# Altium PCB LattePanda_Mu.PcbDoc
Units mm, origin at the board's own origin, x right, y up, seen from the top; angles counter-clockwise.
Board outline 170 x 100 mm, 6 copper layers (Top Layer, Layer 3, Layer 1, Layer 2, Layer 4, Bottom Layer), stack 1.538 mm thick; 197 components, 174 nets, 1059 pads, 0 vias.
Unrouted connection lines stored in the file: 516.
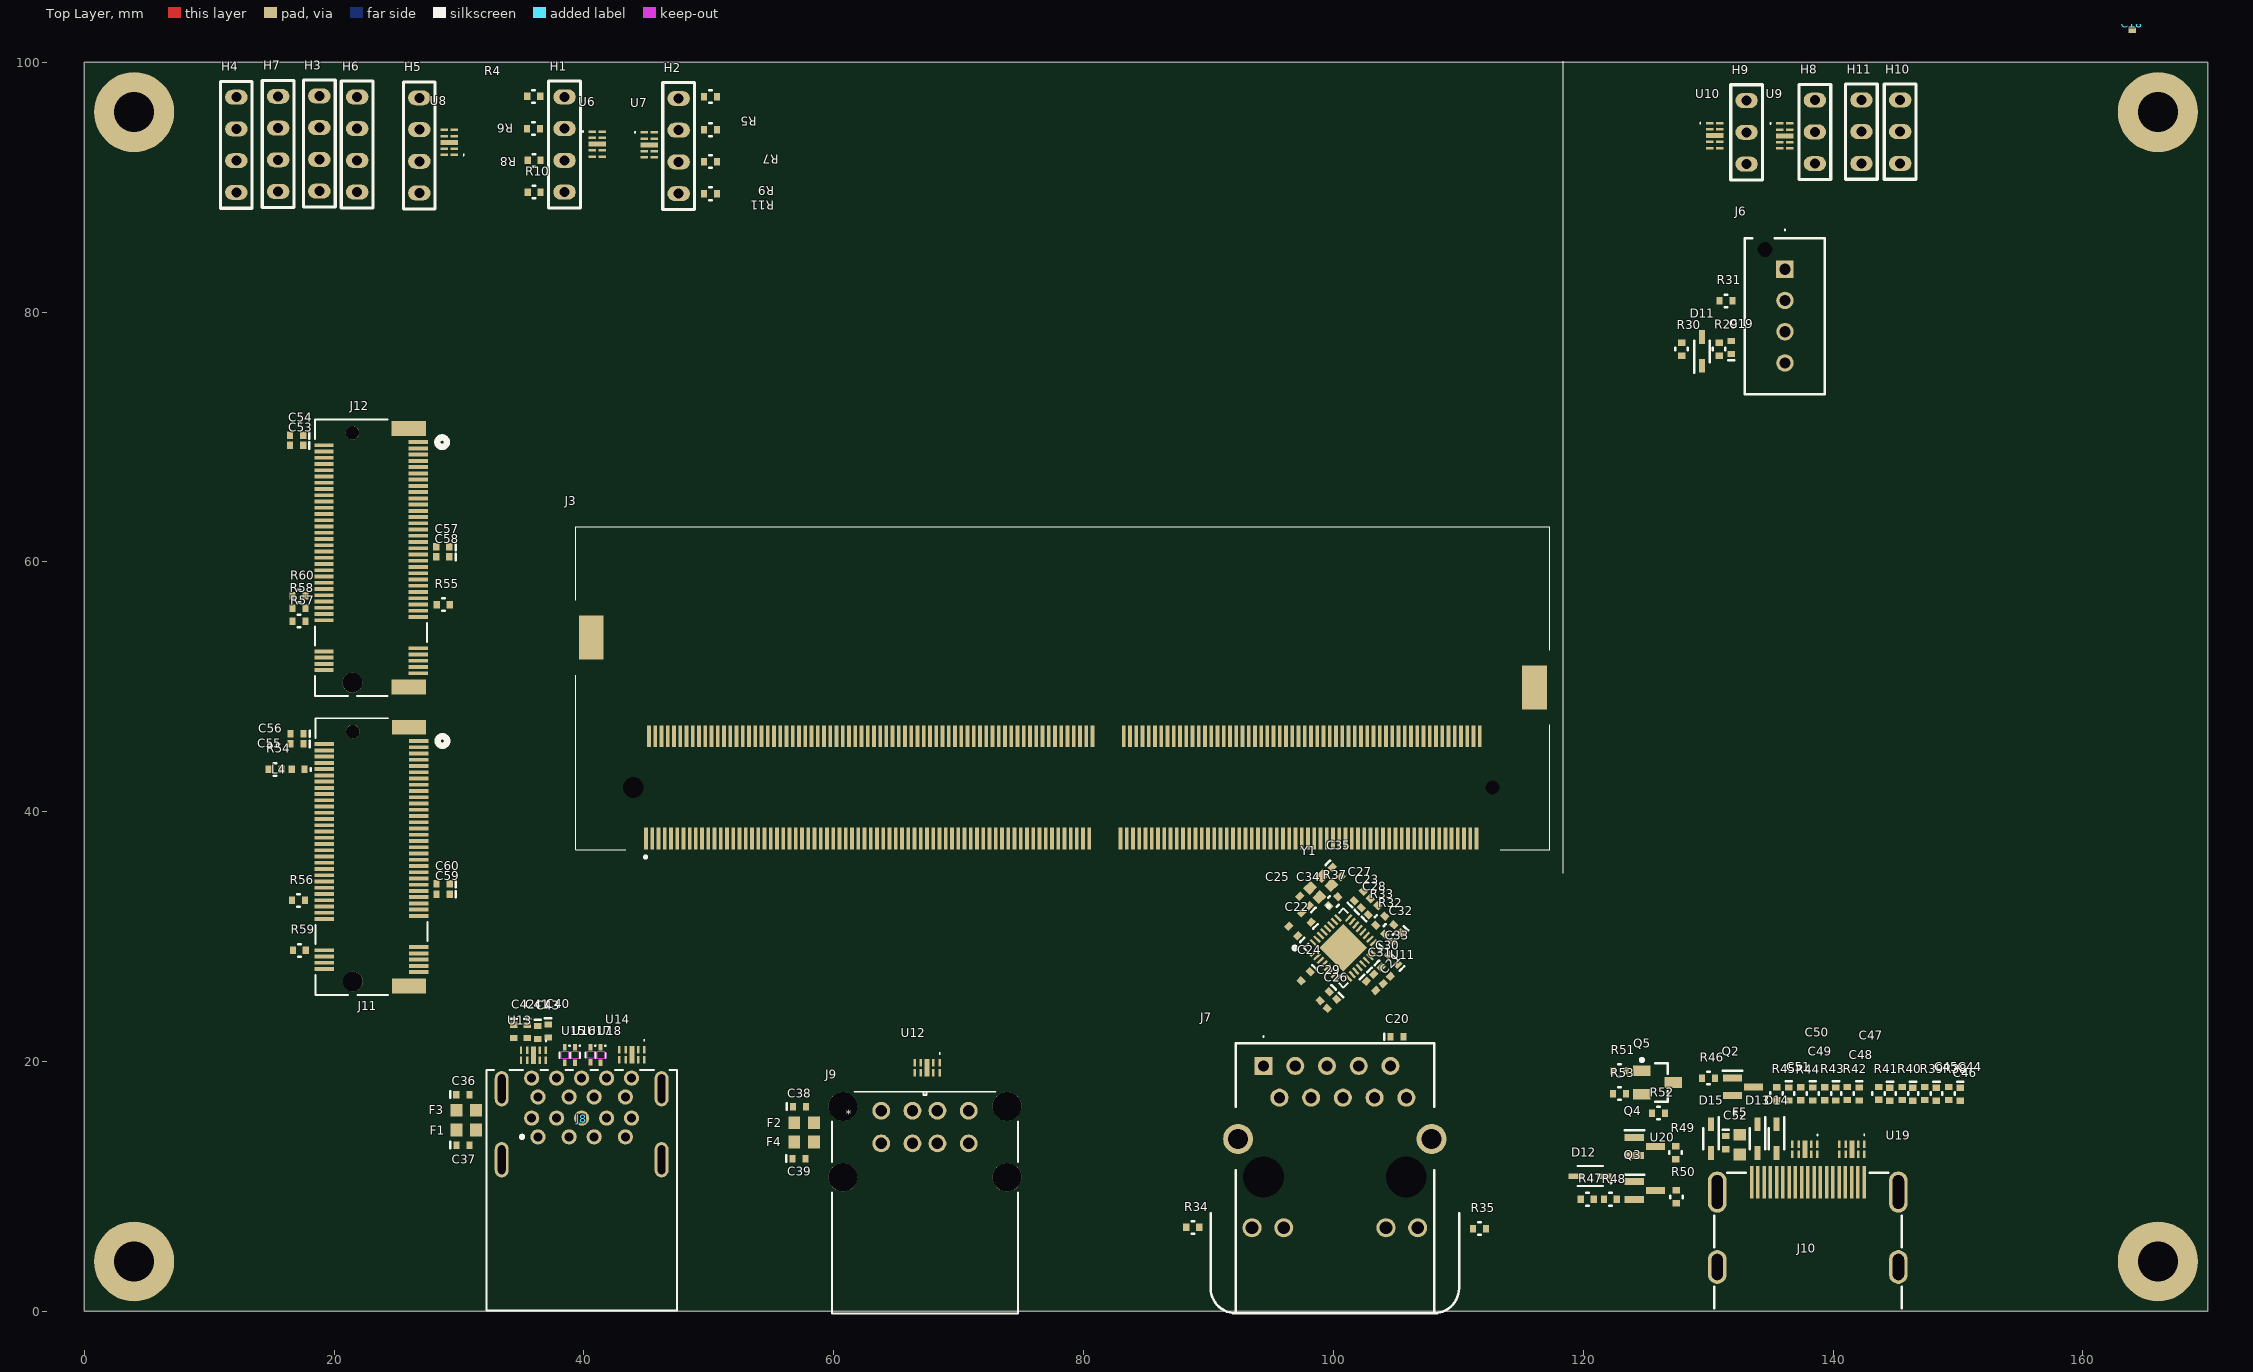
[diagram p0: Top Layer view]
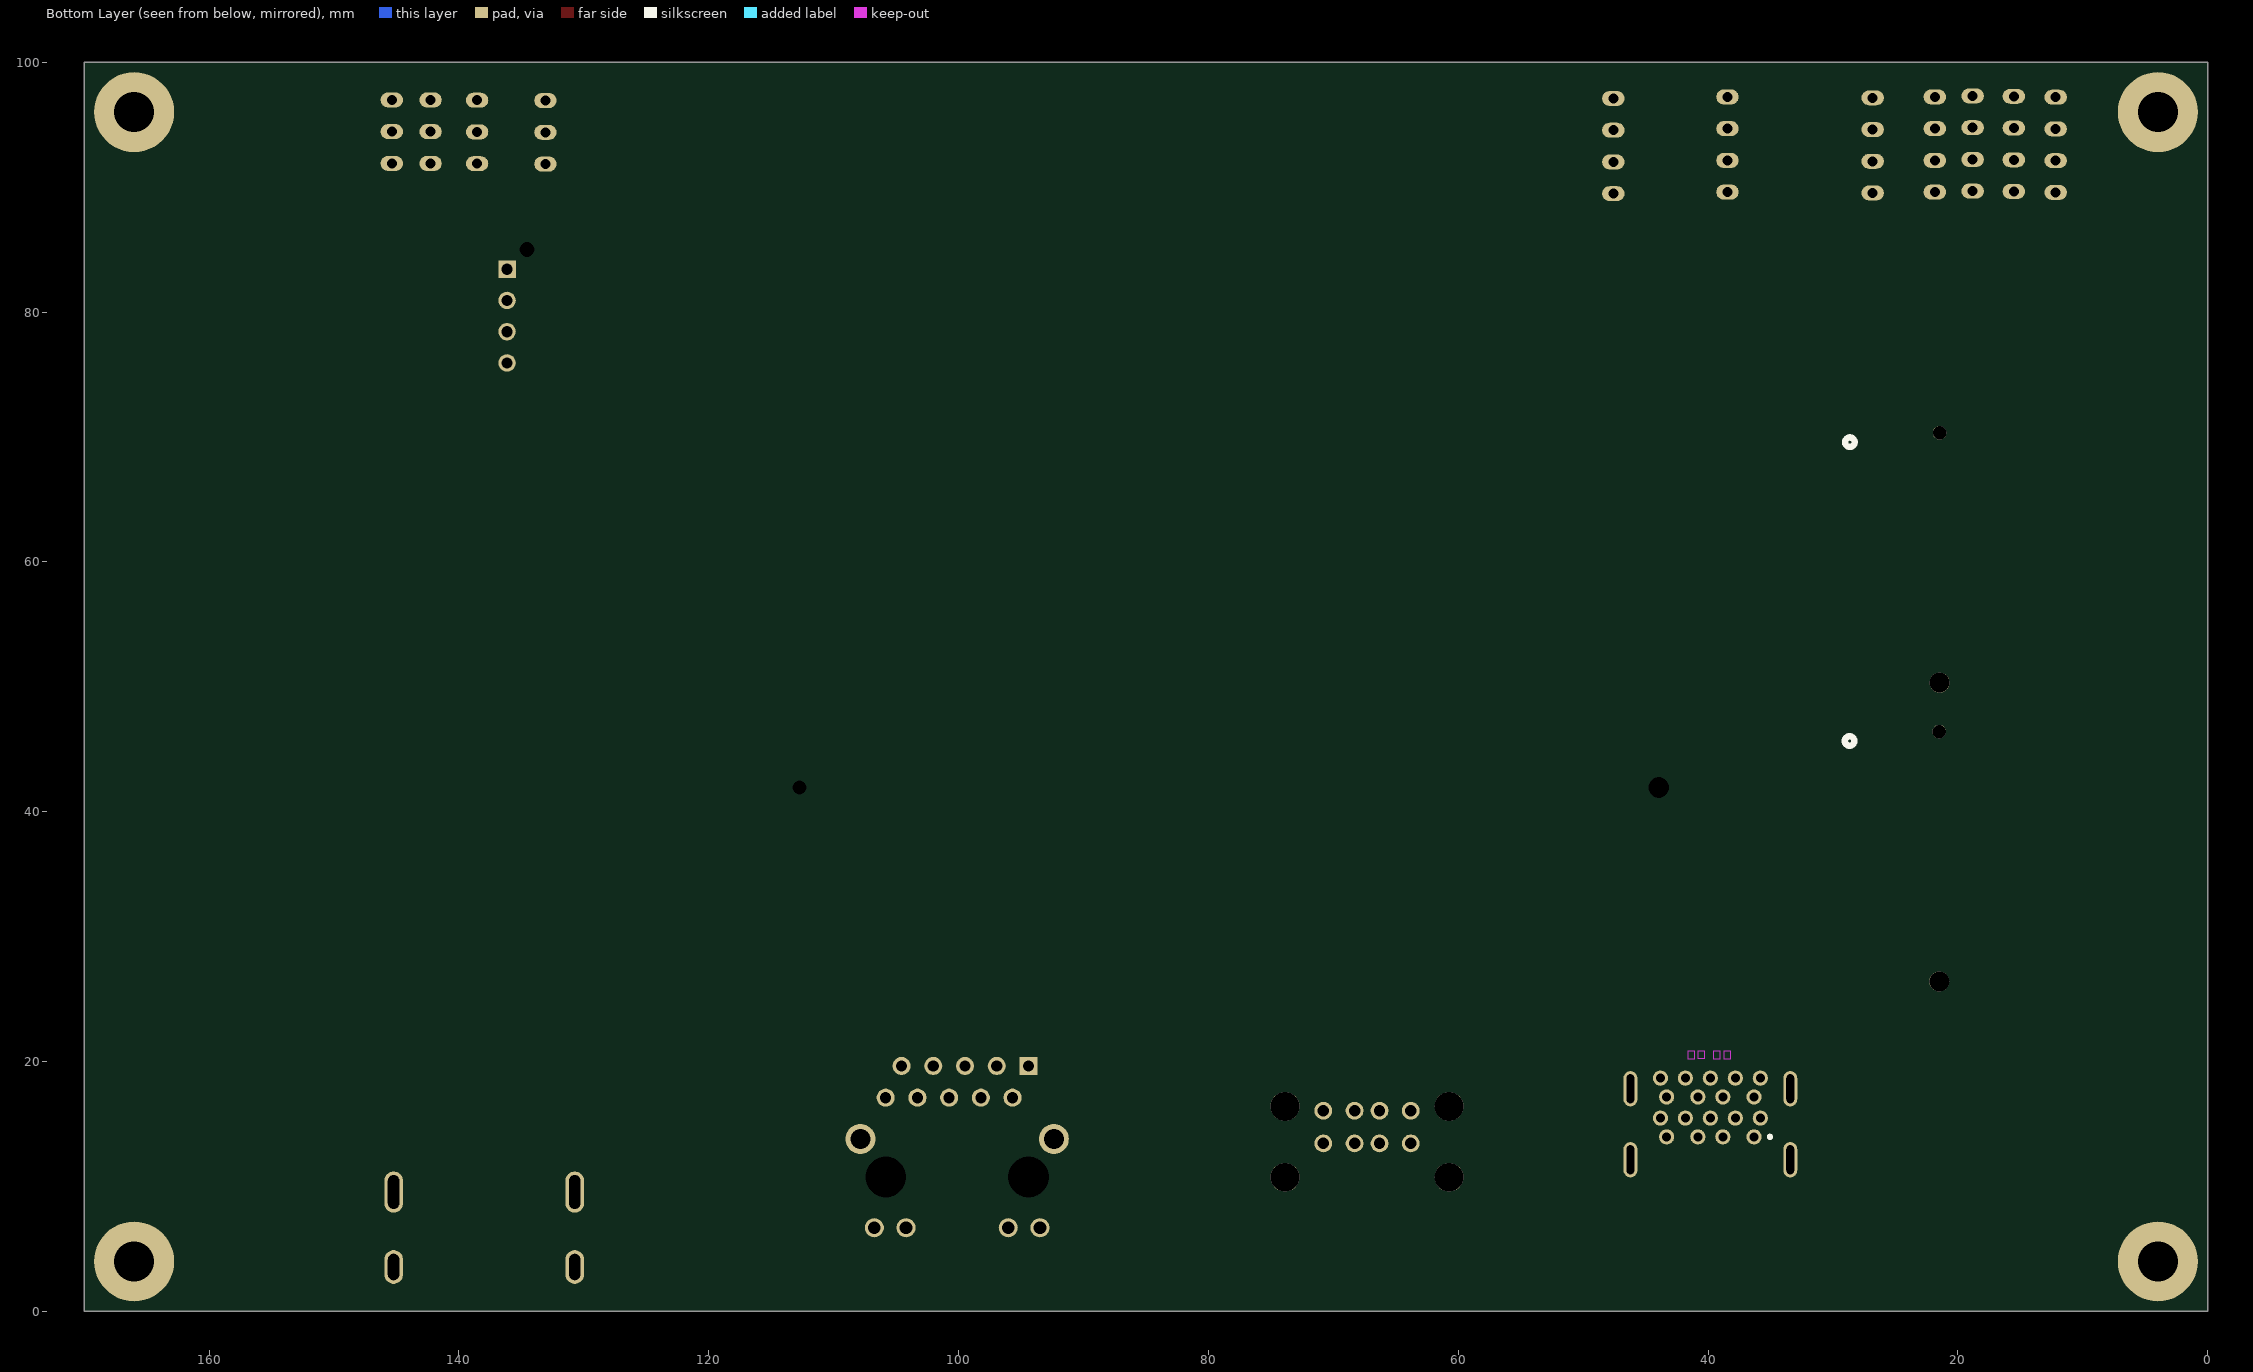
[diagram p1: Bottom Layer view, seen from below]

## Layer stack, top to bottom
Top Solder: solder mask 0.0102, Solder Resist, Dk 3.5
Top Layer: signal copper 0.035
Dielectric 4: prepreg 0.0994, PP-015, Dk 4.4
Layer 3: signal copper 0.0152
Dielectric 2: core 0.55, Core-026, Dk 4.4
Layer 1: signal copper 0.0152
Dielectric 1: prepreg 0.1088, PP-016, Dk 4.4
Layer 2: signal copper 0.0152
Dielectric 3: core 0.55, Core-026, Dk 4.4
Layer 4: signal copper 0.0152
Dielectric 5: prepreg 0.0994, PP-015, Dk 4.4
Bottom Layer: signal copper 0.035
Bottom Solder: solder mask 0.0102, Solder Resist, Dk 3.5

## Board outline
0,0 170,0 170,100 0,100

## Design rules (kind name [scope] priority, off if disabled: settings)
BoardOutlineClearance [All] p1: gap=0.5 ignorepadtopadclearanceinfootprint=FALSE
Clearance [All] p1: gap=0.254 ignorepadtopadclearanceinfootprint=FALSE except(0.127: Arc-Arc Arc-Track Arc-SMDPad Arc-Via Track-Track Track-SMDPad Track-Via SMDPad-Via; 0.152: SMDPad-SMDPad; 0.203: Arc-Fill Arc-Poly Arc-Region Track-Fill Track-Poly Track-Region Via-Fill Via-Poly Via-Region Fill-Fill Fill-Poly Fill-Region Poly-Poly Poly-Region Region-Region; 0.25: Via-Via; 0.3: SMDPad-Fill SMDPad-Poly SMDPad-Region THPad-Fill THPad-Poly THPad-Region; 0.35: SMDPad-THPad THPad-THPad THPad-Via THPad-Text THPad-Hole)
DiffPairsRouting [All] p1: maxlimit=0.254 minlimit=0.254 mostfreqgap=0.254 toplayer_minwidth=0.381 toplayer_maxwidth=0.381 toplayer_prefwidth=0.381 midlayer1_minwidth=0.381 midlayer1_maxwidth=0.381 midlayer1_prefwidth=0.381 midlayer2_minwidth=0.381 midlayer2_maxwidth=0.381 midlayer2_prefwidth=0.381 midlayer3_minwidth=0.381 midlayer3_maxwidth=0.381 midlayer3_prefwidth=0.381 midlayer4_minwidth=0.381 midlayer4_maxwidth=0.381 midlayer4_prefwidth=0.381 bottomlayer_minwidth=0.381 bottomlayer_maxwidth=0.381 bottomlayer_prefwidth=0.381 maxuncoupledlength=12.7
HoleSize [All] p1: absolutevalues=TRUE maxlimit=6.2 minlimit=0.25 maxpercent=80.000 minpercent=20.000
HoleToHoleClearance [All] p1: gap=0.2 allowstackedmicrovias=TRUE
MinimumSolderMaskSliver [All] p1: minsoldermaskwidth=0.13
PlaneConnect [All] p1: planeconnectstyle=Relief reliefexpansion=0.3 reliefentries=4 reliefconductorwidth=0.3 reliefairgap=0.2
PolygonConnect [All] p1: thpad.connectstyle=Relief thpad.reliefconductorwidth=0.5 thpad.reliefentries=4 thpad.polygonreliefangle="90 Angle" thpad.airgapwidth=0.2 smdpad.connectstyle=Relief smdpad.reliefconductorwidth=0.5 smdpad.reliefentries=4 smdpad.polygonreliefangle="90 Angle" smdpad.airgapwidth=0.2 via.connectstyle=Direct via.reliefconductorwidth=0.254 via.reliefentries=4 via.polygonreliefangle="90 Angle" via.airgapwidth=0.254
RoutingVias [All] p1: holewidth=0.3 width=0.6 viastyle="Through Hole" minholewidth=0.2 minwidth=0.2 maxholewidth=0.6 maxwidth=0.7
SilkToSolderMaskClearance [IsPad] p1: minsilkscreentomaskgap=0.15 clearancetoexposedcopper=TRUE
SolderMaskExpansion [All] p1: expansion=0.076 istentingtop=FALSE
Width [All] p1: maxlimit=0.254 minlimit=0.254 preferedwidth=0.254
24 further rules are at their usual default settings.

## Classes and differential pairs
differential pair class 100_OHM_DIFF: TMD_CK TMD_D0 TMD_D1 TMD_D2 TMDS_CK TMDS_D0 TMDS_D1 TMDS_D2
differential pair class 90_OHM_DIFF: STDA_SSRX1 STDA_SSRX2 STDA_SSTX1 STDA_SSTX2 USB2_D1 USB2_D2 USB3_D1 USB3_D2 USB3_SSTX USB4_SSTX
component class "U_[8] Sockets": C53 C54 C55 C56 C57 C58 C59 C60 J11 J12 L4 R54 R55 R56 R57 R58 R59 R60
component class "U_[7] Mini_HDMI": C44 C45 C46 C47 C48 C49 C50 C51 C52 D12 D13 D14 D15 F5 J10 Q2 Q3 Q4 Q5 R38 R39 R40 R41 R42 R43 R44 R45 R46 R47 R48 R49 R50 R51 R52 R53 U19 U20
component class "U_[6] USB": C36 C37 C38 C39 C40 C41 C42 C43 F1 F2 F3 F4 J8 J9 U12 U13 U14 U15 U16 U17 U18
component class "U_[5] Ethernet": C20 C21 C22 C23 C24 C25 C26 C27 C28 C29 C30 C31 C32 C33 C34 C35 J7 R32 R33 R34 R35 R36 R37 U11 Y1
component class "U_[4] GPIOs": H1 H2 H3 H4 H5 H6 H7 H8 H9 H10 H11 U6 U7 U8 U9 U10
component class "U_[3] Fan": C19 D11 J6 R29 R30 R31
component class "U_[2] Power_Supply": B1 B2 C1 C2 C3 C4 C5 C6 C7 C8 C9 C10 C11 C12 C13 C14 C15 C16 C17 C18 C61 D1 D2 D3 D4 D5 D6 D7 D8 D9 D10 J4 J5 JP1 L1 L2 L3 Q1 R14 R15 R16 R17 R18 R19 R20 R21 R22 R23 R24 R25 R26 R27 R28 U1 U2 U3 U4 U5
component class "U_[1] Conn_SODIMM": J1 J2 J3 R1 R2 R3 R4 R5 R6 R7 R8 R9 R10 R11 R12 R13
differential pair USB_D: +USB_D_P -USB_D_N
differential pair USB4_SSTX: +USB4_SSTX_P -USB4_SSTX_N
differential pair USB3_SSTX: +USB3_SSTX_P -USB3_SSTX_N
differential pair USB3_D2: +USB3_D2_P -USB3_D2_N
differential pair USB3_D1: +USB3_D1_P -USB3_D1_N
differential pair USB2_D2: +USB2_D2_P -USB2_D2_N
differential pair USB2_D1: +USB2_D1_P -USB2_D1_N
differential pair TMDS_D2: +TMDS_D2_P -TMDS_D2_N
differential pair TMDS_D1: +TMDS_D1_P -TMDS_D1_N
differential pair TMDS_D0: +TMDS_D0_P -TMDS_D0_N
differential pair TMDS_CK: +TMDS_CK_P -TMDS_CK_N
differential pair TMD_D2: +TMD_D2_P -TMD_D2_N
differential pair TMD_D1: +TMD_D1_P -TMD_D1_N
differential pair TMD_D0: +TMD_D0_P -TMD_D0_N
differential pair TMD_CK: +TMD_CK_P -TMD_CK_N
differential pair STDA_SSTX2: +STDA_SSTX2_P -STDA_SSTX2_N
differential pair STDA_SSTX1: +STDA_SSTX1_P -STDA_SSTX1_N
differential pair STDA_SSRX2: +STDA_SSRX2_P -STDA_SSRX2_N
differential pair STDA_SSRX1: +STDA_SSRX1_P -STDA_SSRX1_N

## Components (designator, comment, footprint, x,y, rotation, side; value= is the part's Value field where it differs from the comment)
B1 "SMD Boton" "Push Boton Nano 2 Pin" 152.654,112.395 r90 top
B2 "SMD Boton" "Push Boton Nano 2 Pin" 178.816,107.823 r90 top
C1 "10uF" "CAPACITOR 0805" 291.49,139.726 r0 top
C2 "220nF" "Capacitor 0402" 294.792,140.361 r0 top
C3 "220nF" "Capacitor 0402" 285.648,140.361 r0 top
C4 "22uF" "Capacitor 0603" 268.122,140.107 r0 top
C5 "22uF" "Capacitor 0603" 272.694,140.107 r0 top
C6 "22uF" "Capacitor 0603" 277.139,140.107 r0 top
C7 "22uF" "Capacitor 0603" 281.711,140.107 r0 top
C8 "1uF" "Capacitor 0402" 236.118,140.361 r0 top
C9 "10uF" "CAPACITOR 0805" 285.496,103.251 r0 top
C10 "220nF" "Capacitor 0402" 288.925,102.616 r90 top
C11 "220nF" "Capacitor 0402" 279.019,102.616 r90 top
C12 "22uF" "Capacitor 0603" 256.921,101.854 r90 top
C13 "22uF" "Capacitor 0603" 262.509,101.854 r90 top
C14 "22uF" "Capacitor 0603" 268.097,101.854 r90 top
C15 "22uF" "Capacitor 0603" 273.685,101.854 r90 top
C16 "1uF" "Capacitor 0402" 196.469,102.616 r90 top
C17 "1uF" "Capacitor 0402" 145.923,115.824 r90 top
C18 "1uF" "Capacitor 0402" 163.957,102.616 r90 top
C19 "100nF" "Capacitor 0402" 131.85,77.675 r270 top
C20 "100nF" "Capacitor 0402" 105.602,21.974 r180 top
C21 "100nF" "Capacitor 0402" 103.377,25.698 r135 top
C22 "100nF" "Capacitor 0402" 96.432,30.814 r315 top
C23 "100nF" "Capacitor 0402" 102.949,33.03 r225 top
C24 "100nF" "Capacitor 0402" 97.423,26.46 r45 top
C25 "100nF" "Capacitor 0402" 97.483,31.892 r315 top
C26 "100nF" "Capacitor 0402" 99.521,24.261 r45 top
C27 "100nF" "Capacitor 0402" 102.396,33.607 r225 top
C28 "100nF" "Capacitor 0402" 103.536,32.477 r225 top
C29 "100nF" "Capacitor 0402" 98.94,24.865 r45 top
C30 "100nF" "Capacitor 0402" 104.561,26.821 r135 top
C31 "100nF" "Capacitor 0402" 103.97,26.255 r135 top
C32 "100nF" "Capacitor 0402" 104.717,29.593 r45 top
C33 "100nF" "Capacitor 0402" 104.42,28.534 r315 top
C34 "12pF" "Capacitor 0402" 97.33,33.22 r315 top
C35 "12pF" "Capacitor 0402" 100.633,34.823 r135 top
C36 "22uF" "Capacitor 0402" 30.823,17.353 r180 top
C37 "22uF" "Capacitor 0402" 30.839,13.306 r180 top
C38 "22uF" "Capacitor 0402" 57.775,16.4 r180 top
C39 "22uF" "Capacitor 0402" 57.725,12.225 r180 top
C40 "100nF" "Capacitor 0402" 37.132,21.933 r90 top
C41 "100nF" "Capacitor 0402" 35.466,21.893 r90 top
C42 "100nF" "Capacitor 0402" 34.373,21.909 r90 top
C43 "100nF" "Capacitor 0402" 36.306,21.813 r90 top
C44 "100nF" "Capacitor 0402" 150.175,16.875 r90 top
C45 "100nF" "Capacitor 0402" 148.275,16.875 r90 top
C46 "100nF" "Capacitor 0402" 146.4,16.875 r90 top
C47 "100nF" "Capacitor 0402" 144.55,16.875 r90 top
C48 "100nF" "Capacitor 0402" 142.1,16.9 r90 top
C49 "100nF" "Capacitor 0402" 140.225,16.9 r90 top
C50 "100nF" "Capacitor 0402" 138.375,16.9 r90 top
C51 "100nF" "Capacitor 0402" 136.45,16.9 r90 top
C52 "100nF" "Capacitor 0402" 131.4,13 r90 top
C53 "100nF" "Capacitor 0402" 16.5,69.325 r0 top
C54 "10uF" "Capacitor 0402" 16.5,70.125 r0 top
C55 "100nF" "Capacitor 0402" 16.525,45.425 r0 top
C56 "10uF" "Capacitor 0402" 16.525,46.25 r0 top
C57 "220nF" "Capacitor 0402" 28.2,61.2 r0 top
C58 "220nF" "Capacitor 0402" 28.2,60.4 r0 top
C59 "220nF" "Capacitor 0402" 28.225,33.4 r0 top
C60 "220nF" "Capacitor 0402" 28.225,34.225 r0 top
C61 "1uF" "Capacitor 0402" 209.423,11.684 r90 top
D1 "MBRS340T3G" DIOM7959X261N 250.952,16.764 r90 top
D2 "MBRS340T3G" DIOM7959X261N 243.205,16.764 r90 top
D3 "MBRS340T3G" DIOM7959X261N 235.458,16.764 r90 top
D4 "MBRS340T3G" DIOM7959X261N 227.711,16.764 r90 top
D5 "MBRS340T3G" DIOM7959X261N 220.091,16.764 r90 top
D6 "MBRS340T3G" DIOM7959X261N 212.344,16.764 r90 top
D7 "PESD5V0S1BAF" SOD2512X110N 209.55,102.997 r0 top
D8 "PESD5V0S1BAF" SOD2512X110N 214.757,102.997 r0 top
D9 "PESD5V0S1BAF" SOD2512X110N 175.514,102.997 r0 top
D10 "PESD5V0S1BAF" SOD2512X110N 180.848,102.997 r0 top
D11 "B5819WSHE3-TP" SOD2512X115N 129.5,76.85 r90 top
D12 "1N5819WS" SOD-323_MCC 120.55,10.825 r180 top
D13 "PESD5V0S1BAF" SOD2512X110N 133.95,13.825 r270 top
D14 "PESD5V0S1BAF" SOD2512X110N 135.475,13.825 r270 top
D15 "PESD5V0S1BAF" SOD2512X110N 130.225,13.825 r270 top
F1 "0603L100SLYR" FUSC1608X100N 30.584,14.524 r180 top
F2 "0603L100SLYR" FUSC1608X100N 57.625,15.1 r180 top
F3 "0603L100SLYR" FUSC1608X100N 30.584,16.091 r180 top
F4 "0603L100SLYR" FUSC1608X100N 57.625,13.55 r180 top
F5 "0603L100SLYR" FUSC1608X100N 132.525,13.35 r90 top
H1 "Header 4x1" "HM 4X1" 38.45,89.6 r90 top
H2 "Header 4x1" "HM 4X1" 47.588,89.474 r90 top
H3 "Header 4x1" "HM 4X1" 18.825,89.675 r90 top
H4 "Header 4x1" "HM 4X1" 12.175,89.575 r90 top
H5 "Header 4x1" "HM 4X1" 26.825,97.15 r270 top
H6 "Header 4x1" "HM 4X1" 21.85,89.6 r90 top
H7 "Header 4x1" "HM 4X1" 15.525,89.65 r90 top
H8 "Header 3x1" "HM 3X1" 138.55,91.875 r90 top
H9 "Header 3x1" "HM 3X1" 133.075,91.85 r90 top
H10 "Header 3x1" "HM 3X1" 145.375,91.9 r90 top
H11 "Header 3x1" "HM 3X1" 142.275,91.9 r90 top
J1 "S8411-45R" HARWIN_S8411-45R 215.9,35.433 r0 top
J2 "Header 3x1" "HM 3X1" 240.919,75.438 r90 top
J3 "2309413-1" 23094131 78.341,49.867 r180 top
J4 "PJACK" "JACK DC" 251.485,126.137 r90 top
J5 "UJ20-C-H-G-SMT-1-P16-TR" SAMESKY_UJ20-C-H-G-SMT-1-P16-TR 172.745,127.661 r90 top
J6 "B04B-XASK-1-A_LF__SN_" B04BXASK1ALFSN 136.15,83.425 r90 top
J7 "HFJ11-1G01E-L12RL" HFJ111G01EL12RL 94.409,19.645 r0 top
J8 "USB1100-30-A" CONN_USB1100_GCT 36.322,13.97 r0 top
J9 "5787745-2" CONN_5787745-2_TEC 63.805,16.064 r0 top
J10 "685119134923" 685119134923 137.98,5.027 r0 top
J11 "1-2199230-6" CONN67_2199230_TEC 19.222,27.16 r270 top
J12 "2199230-4" CONN67_2199230_TEC 19.197,51.084 r270 top
JP1 "*" SolderJumper-3_P1.3mm_Bridged12 232.689,139.853 r0 top
L1 "B82472P6222M000" IND_EPCOS_B82472P6_EPC 308.635,136.551 r0 top
L2 "Led 0402" "LED 0402" 210.083,140.107 r0 top
L3 "B82472P6222M000" IND_EPCOS_B82472P6_EPC 178.587,136.551 r0 top
L4 "Led 0402" "LED 0402" 17.125,43.4 r0 top
Q1 "2N7002" SOT23127P600-8N 199.923,138.583 r0 top
Q2 "2SK3018" SOT96P240X120-3N 132.8,17.975 r0 top
Q3 "2SK3018" SOT96P240X120-3N 124.95,9.675 r0 top
Q4 "2SK3018" SOT96P240X120-3N 124.95,13.2 r0 top
Q5 "2N7002" SOT23127P600-8N 125.95,18.325 r0 top
R1 "10K" "Resistencia 0402" 244.729,81.28 r0 top
R2 "10K" "Resistencia 0402" 202.438,81.28 r0 top
R3 "10K" "Resistencia 0402" 206.756,81.28 r0 top
R4 "4k7" "Resistencia 0402" 35.987,97.254 r180 top
R5 "4k7" "Resistencia 0402" 50.131,97.243 r0 top
R6 "4k7" "Resistencia 0402" 35.969,94.682 r180 top
R7 "4k7" "Resistencia 0402" 50.131,94.593 r0 top
R8 "4k7" "Resistencia 0402" 36.019,92.132 r180 top
R9 "4k7" "Resistencia 0402" 50.131,92.043 r0 top
R10 "4k7" "Resistencia 0402" 36.018,89.592 r180 top
R11 "4k7" "Resistencia 0402" 50.131,89.468 r0 top
R12 "100k" "Resistencia 0402" 204.597,71.247 r90 top
R13 "100k" "Resistencia 0402" 199.009,71.247 r90 top
R14 "10K" "Resistencia 0402" 299.364,139.726 r90 top
R15 "100k" "Resistencia 0402" 262.153,139.726 r90 top
R16 "24.9k" "Resistencia 0402" 240.69,139.726 r90 top
R17 "100k" "Resistencia 0402" 225.323,139.726 r90 top
R18 "100k" "Resistencia 0402" 219.735,139.726 r90 top
R19 "330" "Resistencia 0402" 214.147,139.726 r90 top
R20 "1k" "Resistencia 0402" 203.987,139.726 r90 top
R21 "10k" "Resistencia 0402" 184.683,139.726 r90 top
R22 "100k" "Resistencia 0402" 251.079,103.251 r90 top
R23 "43.3k" "Resistencia 0402" 245.237,103.251 r90 top
R24 "10k" "Resistencia 0402" 218.694,103.251 r90 top
R25 "56k" "Resistencia 0402" 224.536,103.251 r90 top
R26 "1k" "Resistencia 0402" 202.311,103.251 r90 top
R27 "100" "Resistencia 0402" 185.039,103.251 r90 top
R28 "100" "Resistencia 0402" 190.881,103.251 r90 top
R29 "10K" "Resistencia 0402" 130.875,77.025 r270 top
R30 "21.5k" "Resistencia 0402" 127.875,77.025 r90 top
R31 "100" "Resistencia 0402" 131.425,80.9 r0 top
R32 "10K" "Resistencia 0402" 104.465,30.565 r45 top
R33 "10K" "Resistencia 0402" 103.754,31.284 r45 top
R34 "220" "Resistencia 0402" 88.75,6.725 r0 top
R35 "220" "Resistencia 0402" 111.7,6.625 r180 top
R36 "2.49k" "Resistencia 0402" 198.755,164.592 r90 top
R37 "1M" "Resistencia 0402" 100,32.825 r45 top
R38 "470" "Resistencia 0402" 149.25,17.45 r270 top
R39 "470" "Resistencia 0402" 147.325,17.45 r270 top
R40 "470" "Resistencia 0402" 145.525,17.45 r270 top
R41 "470" "Resistencia 0402" 143.645,17.452 r270 top
R42 "470" "Resistencia 0402" 141.15,17.45 r270 top
R43 "470" "Resistencia 0402" 139.35,17.425 r270 top
R44 "470" "Resistencia 0402" 137.4,17.425 r270 top
R45 "470" "Resistencia 0402" 135.475,17.425 r270 top
R46 "2k2" "Resistencia 0402" 130.025,18.675 r0 top
R47 "2k2" "Resistencia 0402" 120.325,8.975 r180 top
R48 "2k2" "Resistencia 0402" 122.175,8.975 r0 top
R49 "2k2" "Resistencia 0402" 127.4,12.7 r90 top
R50 "2k2" "Resistencia 0402" 127.45,9.175 r90 top
R51 "1M" "Resistencia 0402" 122.9,19.275 r180 top
R52 "1k" "Resistencia 0402" 126.025,15.875 r0 top
R53 "21k5" "Resistencia 0402" 122.9,17.425 r180 top
R54 "330" "Resistencia 0402" 15.285,43.396 r180 top
R55 "0" "Resistencia 0402" 28.75,56.575 r180 top
R56 "0" "Resistencia 0402" 17.15,32.9 r0 top
R57 "10k" "Resistencia 0402" 17.2,55.25 r180 top
R58 "10k" "Resistencia 0402" 17.2,56.275 r180 top
R59 "0" "Resistencia 0402" 17.225,28.9 r0 top
R60 "0" "Resistencia 0402" 17.2,57.275 r0 top
U1 "LMR33630BDDA" DDA0008J 317.779,137.821 r0 top
U2 "MM5Z3V3T1G" SOD-523_0P9X1P3_ONS 258.597,139.98 r0 top
U3 "LMR33630BDDA" DDA0008J 192.938,137.821 r0 top
U4 "USBLC6-2SC6" SOT95P280X145-6N 241.173,102.489 r0 top
U5 "*" ESSOP-10_CH224K 233.426,100.965 r0 top
U6 "ULC0524P" ESDLC0524DFN10TP 41.075,93.45 r270 top
U7 "ULC0524P" ESDLC0524DFN10TP 45.249,93.387 r270 top
U8 "ULC0524P" ESDLC0524DFN10TP 29.225,93.575 r90 top
U9 "ULC0524P" ESDLC0524DFN10TP 136.15,94.1 r270 top
U10 "ULC0524P" ESDLC0524DFN10TP 130.525,94.125 r270 top
U11 "RTL8111H-CG" RTL8111H-CG 100.802,29.092 r315 top
U12 "D3V3XA4B10LP" ESDLC0524DFN10TP 67.488,19.493 r180 top
U13 "D3V3XA4B10LP" ESDLC0524DFN10TP 35.967,20.497 r180 top
U14 "D3V3XA4B10LP" ESDLC0524DFN10TP 43.837,20.549 r180 top
U15 "ESD9B5.0ST5G" SOD-923_ONS 38.469,20.525 r270 top
U16 "ESD9B5.0ST5G" SOD-923_ONS 39.299,20.525 r270 top
U17 "ESD9B5.0ST5G" SOD-923_ONS 40.537,20.536 r270 top
U18 "ESD9B5.0ST5G" SOD-923_ONS 41.342,20.522 r270 top
U19 "D3V3XA4B10LP" ESDLC0524DFN10TP 141.5,12.975 r180 top
U20 "D3V3XA4B10LP" ESDLC0524DFN10TP 137.75,12.975 r180 top
Y1 "ECS-250-9-37B2-CKM-TR" XTAL_ECS-250-9-37B2-CKM-TR 98.99,34.014 r45 top

## Footprints (in the part's own frame and the unit in brackets; to place one, negate y for a bottom-side part, rotate by r counter-clockwise, add the part's x,y. Pads: shape width x height; smd on the part's side, far side on the other; paste and mask are expansions set on the pad)
23094131 [mm]
  rect 0.3x1.75 smd: 1(33.375,12.025) 2(33.125,3.825) 3(32.875,12.025) 4(32.625,3.825) 5(32.375,12.025) 6(32.125,3.825) 7(31.875,12.025) 8(31.625,3.825) 9(31.375,12.025) 10(31.125,3.825) 11(30.875,12.025) 12(30.625,3.825) 13(30.375,12.025) 14(30.125,3.825) 15(29.875,12.025) 16(29.625,3.825) 17(29.375,12.025) 18(29.125,3.825) 19(28.875,12.025) 20(28.625,3.825) 21(28.375,12.025) 22(28.125,3.825) 23(27.875,12.025) 24(27.625,3.825) 25(27.375,12.025) 26(27.125,3.825) 27(26.875,12.025) 28(26.625,3.825) 29(26.375,12.025) 30(26.125,3.825) 31(25.875,12.025) 32(25.625,3.825) 33(25.375,12.025) 34(25.125,3.825) 35(24.875,12.025) 36(24.625,3.825) 37(24.375,12.025) 38(24.125,3.825) 39(23.875,12.025) 40(23.625,3.825) 41(23.375,12.025) 42(23.125,3.825) 43(22.875,12.025) 44(22.625,3.825) 45(22.375,12.025) 46(22.125,3.825) 47(21.875,12.025) 48(21.625,3.825) 49(21.375,12.025) 50(21.125,3.825) 51(20.875,12.025) 52(20.625,3.825) 53(20.375,12.025) 54(20.125,3.825) 55(19.875,12.025) 56(19.625,3.825) 57(19.375,12.025) 58(19.125,3.825) 59(18.875,12.025) 60(18.625,3.825) 61(18.375,12.025) 62(18.125,3.825) 63(17.875,12.025) 64(17.625,3.825) 65(17.375,12.025) 66(17.125,3.825) 67(16.875,12.025) 68(16.625,3.825) 69(16.375,12.025) 70(16.125,3.825) 71(15.875,12.025) 72(15.625,3.825) 73(15.375,12.025) 74(15.125,3.825) 75(14.875,12.025) 76(14.625,3.825) 77(14.375,12.025) 78(14.125,3.825) 79(13.875,12.025) 80(13.625,3.825) 81(13.375,12.025) 82(13.125,3.825) 83(12.875,12.025) 84(12.625,3.825) 85(12.375,12.025) 86(12.125,3.825) 87(11.875,12.025) 88(11.625,3.825) 89(11.375,12.025) 90(11.125,3.825) 91(10.875,12.025) 92(10.625,3.825) 93(10.375,12.025) 94(10.125,3.825) 95(9.875,12.025) 96(9.625,3.825) 97(9.375,12.025) 98(9.125,3.825) 99(8.875,12.025) 100(8.625,3.825) 101(8.375,12.025) 102(8.125,3.825) 103(7.875,12.025) 104(7.625,3.825) 105(7.375,12.025) 106(7.125,3.825) 107(6.875,12.025) 108(6.625,3.825) 109(6.375,12.025) 110(6.125,3.825) 111(5.875,12.025) 112(5.625,3.825) 113(5.375,12.025) 114(5.125,3.825) 115(4.875,12.025) 116(4.625,3.825) 117(4.375,12.025) 118(4.125,3.825) 119(3.875,12.025) 120(3.625,3.825) 121(3.375,12.025) 122(3.125,3.825) 123(2.875,12.025) 124(2.625,3.825) 125(2.375,12.025) 126(2.125,3.825) 127(1.875,12.025) 128(1.625,3.825) 129(1.375,12.025) 130(1.125,3.825) 131(0.875,12.025) 132(0.625,3.825) 133(0.375,12.025) 134(0.125,3.825) 135(-0.125,12.025) 136(-0.375,3.825) 137(-0.625,12.025) 138(-0.875,3.825) 139(-1.125,12.025) 140(-1.375,3.825) 141(-1.625,12.025) 142(-1.875,3.825) 143(-2.125,12.025) 144(-2.375,3.825) 145(-4.625,12.025) 146(-4.875,3.825) 147(-5.125,12.025) 148(-5.375,3.825) 149(-5.625,12.025) 150(-5.875,3.825) 151(-6.125,12.025) 152(-6.375,3.825) 153(-6.625,12.025) 154(-6.875,3.825) 155(-7.125,12.025) 156(-7.375,3.825) 157(-7.625,12.025) 158(-7.875,3.825) 159(-8.125,12.025) 160(-8.375,3.825) 161(-8.625,12.025) 162(-8.875,3.825) 163(-9.125,12.025) 164(-9.375,3.825) 165(-9.625,12.025) 166(-9.875,3.825) 167(-10.125,12.025) 168(-10.375,3.825) 169(-10.625,12.025) 170(-10.875,3.825) 171(-11.125,12.025) 172(-11.375,3.825) 173(-11.625,12.025) 174(-11.875,3.825) 175(-12.125,12.025) 176(-12.375,3.825) 177(-12.625,12.025) 178(-12.875,3.825) 179(-13.125,12.025) 180(-13.375,3.825) 181(-13.625,12.025) 182(-13.875,3.825) 183(-14.125,12.025) 184(-14.375,3.825) 185(-14.625,12.025) 186(-14.875,3.825) 187(-15.125,12.025) 188(-15.375,3.825) 189(-15.625,12.025) 190(-15.875,3.825) 191(-16.125,12.025) 192(-16.375,3.825) 193(-16.625,12.025) 194(-16.875,3.825) 195(-17.125,12.025) 196(-17.375,3.825) 197(-17.625,12.025) 198(-17.875,3.825) 199(-18.125,12.025) 200(-18.375,3.825) 201(-18.625,12.025) 202(-18.875,3.825) 203(-19.125,12.025) 204(-19.375,3.825) 205(-19.625,12.025) 206(-19.875,3.825) 207(-20.125,12.025) 208(-20.375,3.825) 209(-20.625,12.025) 210(-20.875,3.825) 211(-21.125,12.025) 212(-21.375,3.825) 213(-21.625,12.025) 214(-21.875,3.825) 215(-22.125,12.025) 216(-22.375,3.825) 217(-22.625,12.025) 218(-22.875,3.825) 219(-23.125,12.025) 220(-23.375,3.825) 221(-23.625,12.025) 222(-23.875,3.825) 223(-24.125,12.025) 224(-24.375,3.825) 225(-24.625,12.025) 226(-24.875,3.825) 227(-25.125,12.025) 228(-25.375,3.825) 229(-25.625,12.025) 230(-25.875,3.825) 231(-26.125,12.025) 232(-26.375,3.825) 233(-26.625,12.025) 234(-26.875,3.825) 235(-27.125,12.025) 236(-27.375,3.825) 237(-27.625,12.025) 238(-27.875,3.825) 239(-28.125,12.025) 240(-28.375,3.825) 241(-28.625,12.025) 242(-28.875,3.825) 243(-29.125,12.025) 244(-29.375,3.825) 245(-29.625,12.025) 246(-29.875,3.825) 247(-30.125,12.025) 248(-30.375,3.825) 249(-30.625,12.025) 250(-30.875,3.825) 251(-31.125,12.025) 252(-31.375,3.825) 253(-31.625,12.025) 254(-31.875,3.825) 255(-32.125,12.025) 256(-32.375,3.825) 257(-32.625,12.025) 258(-32.875,3.825) 259(-33.125,12.025) 260(-33.375,3.825)
  round 0.575 hole 1.15 unplated: MH1(-34.4,7.925)
  round 0.825 hole 1.65 unplated: MH2(34.4,7.925)
  rect 2x3.5 smd: MP1(37.75,-4.075) MP2(-37.75,-0.075)
  silkscreen extent -39,-12.93 39,13.6, body extent -38.13,-13.11 37.97,12.74, height 9.22
685119134923 [mm] "HDMI SMT Horizontal"
  rect 0.28x2.6 smd: 1(4.5,5.325) 2(4,5.325) 3(3.5,5.325) 4(3,5.325) 5(2.5,5.325) 6(2,5.325) 7(1.5,5.325) 8(1,5.325) 9(0.5,5.325) 10(0,5.325) 11(-0.5,5.325) 12(-1,5.325) 13(-1.5,5.325) 14(-2,5.325) 15(-2.5,5.325) 16(-3,5.325) 17(-3.5,5.325) 18(-4,5.325) 19(-4.5,5.325)
  oval 1.5x2.7 hole 0.9 slot 2.1 at 90 deg: Shell(-7.25,-1.475) Shell(7.25,-1.475)
  oval 1.5x3.3 hole 0.9 slot 2.7 at 90 deg: Shell(-7.25,4.525) Shell(7.25,4.525)
  silkscreen extent -7.5,-4.78 7.5,6.07, body extent -7.55,-6.07 7.45,6.08, height 6.17
B04BXASK1ALFSN [mm]
  rect 1.4x1.4 hole 0.9: 1(0,0)
  round 1.4 hole 0.9: 2(-2.5,0) 3(-5,0) 4(-7.5,0)
  round 0.6 hole 1.2 unplated: 5(1.6,1.6)
  silkscreen extent -10,-3.2 3.2,3.2, body extent -9.93,-3.45 2.57,2.95, height 8.84
"Capacitor 0402" [mm] "Capacitor 0402"
  rect 0.5x0.6 smd: 1(-0.015,0) 2(1.031,0)
  silkscreen extent 1.52,-0.25 1.52,0.25, body extent 0.01,-0.26 1.01,0.27, height 0.36
"Capacitor 0603" [mm] "Chip Capacitor 0603 SMD"
  rect 1.1x1 smd: 1(0.039,0) 2(1.739,0)
  silkscreen extent -0.81,-0.4 -0.81,0.4, body extent 0.09,-0.4 1.69,0.4, height 0.9
"CAPACITOR 0805" [mm] "SMD CAPACITOR"
  rect 1x1.4 smd: 1(-1,0) 2(1,0)
  silkscreen extent -0.1,-0.6 0.1,0.6, body extent -1.05,-0.65 1.05,0.65, height 1
CONN67_2199230_TEC [mil]
  rect 12x61 smd paste+0 mask+0: 1(-728.35,297.24) 2(-718.5,0) 3(-708.66,297.24) 4(-698.82,0) 5(-688.98,297.24) 6(-679.13,0) 7(-669.29,297.24) 8(-659.45,0) 9(-649.61,297.24) 10(-639.76,0) 11(-629.92,297.24) 12(-620.08,0) 13(-610.24,297.24) 14(-600.39,0) 15(-590.55,297.24) 16(-580.71,0) 17(-570.87,297.24) 18(-561.02,0) 19(-551.18,297.24) 20(-541.34,0) 21(-531.5,297.24) 22(-521.65,0) 23(-511.81,297.24) 24(-501.97,0) 25(-492.13,297.24) 26(-482.28,0) 27(-472.44,297.24) 28(-462.6,0) 29(-452.76,297.24) 30(-442.91,0) 31(-433.07,297.24) 32(-423.23,0) 33(-413.39,297.24) 34(-403.54,0) 35(-393.7,297.24) 36(-383.86,0) 37(-374.02,297.24) 38(-364.17,0) 39(-354.33,297.24) 40(-344.49,0) 41(-334.65,297.24) 42(-324.8,0) 43(-314.96,297.24) 44(-305.12,0) 45(-295.28,297.24) 46(-285.43,0) 47(-275.59,297.24) 48(-265.75,0) 49(-255.91,297.24) 50(-246.06,0) 51(-236.22,297.24) 52(-226.38,0) 53(-216.54,297.24) 54(-206.69,0) 55(-196.85,297.24) 56(-187.01,0) 57(-177.17,297.24) 58(-167.32,0) 67(-78.74,297.24) 68(-68.9,0) 69(-59.06,297.24) 70(-49.21,0) 71(-39.37,297.24) 72(-29.53,0) 73(-19.68,297.24) 74(-9.84,0) 75(0,297.24)
  rect 47x108 smd paste-54 mask-54: 76(-771.65,266.73) 77(43.31,266.73)
  round 43 hole 43 unplated paste+0 mask+0: 78(-757.87,89.57)
  round 63 hole 63 unplated paste+0 mask+0: 79(29.53,89.57)
  silkscreen extent -800,-28 72,387, body extent -796,-24 66,319, height 161
CONN_5787745-2_TEC [mil]
  round 56 hole 36 paste-28 mask+0: 1(0,0) 2(98.43,0) 3(177.17,0) 4(275.59,0) 5(0,-103.15) 6(98.43,-103.15) 7(177.17,-103.15) 8(275.59,-103.15)
  round 91 hole 91 unplated paste+0 mask+0: 9(-120.87,13.78) 10(396.46,13.78) 11(-120.87,-209.84) 12(396.46,-209.84)
  silkscreen extent -155,-639 431,60, body extent -185,-629 455,67, height 610
CONN_USB1100_GCT [mil]
  round 48 hole 28 paste-24 mask+0: 1(0,0) 2(98.43,0) 3(177.17,0) 4(275.59,0) 5(295.28,59.06) 6(216.54,59.06) 7(137.8,59.06) 8(59.05,59.06) 9(-19.69,59.06) 10(0,125.98) 11(98.43,125.98) 12(177.17,125.98) 13(275.59,125.98) 14(295.28,185.04) 15(216.54,185.04) 16(137.8,185.04) 17(59.05,185.04) 18(-19.69,185.04)
  oval 44x111 hole 24 slot 91 at 90 deg paste-55.5 mask+0: 19(-114.17,151.57) 20(389.76,151.57) 21(-114.17,-72.05) 22(389.76,-72.05)
  silkscreen extent -162,-548 438,211, body extent -150,-541 440,207, height 608
DDA0008J [mm]
  rect 1.55x0.6 smd paste+0 mask+0.051: 1(-2.7,1.905) 2(-2.7,0.635) 3(-2.7,-0.635) 4(-2.7,-1.905) 5(2.7,-1.905) 6(2.7,-0.635) 7(2.7,0.635) 8(2.7,1.905)
  rect 2.95x4.9 smd paste-2.437 mask-2.438: 9(0,0)
  round 0.5 hole 0.203 paste-0.25 mask+0.051: GND(-0.65,-1.95) GND(-0.65,-0.65) GND(-0.65,0.65) GND(-0.65,1.95) GND(0.65,-1.95) GND(0.65,-0.65) GND(0.65,0.65) GND(0.65,1.95)
  silkscreen extent -2.62,-2.55 1.51,2.74, body extent -3,-2.46 3.03,2.44, height 1.57
DIOM7959X261N [mm]
  rect 2.25x3.12 smd: A(3.455,0) C(-3.455,0)
  silkscreen extent -5.3,-2.95 3.44,2.95, body extent -3.98,-2.95 3.98,2.95, height 2.62
ESDLC0524DFN10TP [mm]
  rect 0.2x0.6 smd: 1(-1,-0.4) 2(-0.5,-0.4) 4(0.5,-0.4) 5(1,-0.4) 6(1,0.4) 7(0.5,0.4) 9(-0.5,0.4) 10(-1,0.4)
  rect 0.4x1.4 smd: 3(0,0)
  silkscreen extent -1.05,-1.2 -0.95,-1.1, body extent -1.22,-0.43 1.28,0.57, height 0.43
ESSOP-10_CH224K [mm] "ESSOP-10, cuerpo 3.9x4.9mm, paso 1.00mm, EP 2.1x3.3mm (WCH CH224K)"
  rect 2.1x3.3 smd paste-0.3: 0(0,0)
  rect 1.95x0.6 smd: 1(-2.475,2)
  rrect50% 1.95x0.6 smd: 2(-2.475,1) 3(-2.475,0) 4(-2.475,-1) 5(-2.475,-2) 6(2.475,-2) 7(2.475,-1) 8(2.475,0) 9(2.475,1) 10(2.475,2)
  silkscreen extent -2.37,-2.51 1.95,2.97, body extent -3.45,-2.3 3.45,2.3
FUSC1608X100N [mm]
  rect 0.95x1.02 smd paste+0 mask+0.102: 1(-0.785,0) 2(0.785,0)
  body extent -0.8,-0.4 0.8,0.4, height 0.75
HARWIN_S8411-45R [mm]
  rect 2.3x4.5 smd: N(0,8.425) P(0,-7.975)
  round 1.3 hole 1.3 unplated: ""(0,-3.725)
  round 1.05 hole 1.05 unplated: ""(0,3.725)
  silkscreen extent -7.37,-10 7.37,6.96, body extent -7.37,-9.6 7.37,9.6, height 4.25
HFJ111G01EL12RL [mm]
  rect 1.446x1.446 hole 0.89: 1(0,0)
  round 1.446 hole 0.89: 2(1.27,-2.54) 3(2.54,0) 4(3.81,-2.54) 5(5.08,0) 6(6.35,-2.54) 7(7.62,0) 8(8.89,-2.54) 9(10.16,0) 10(11.43,-2.54)
  round 1.53 hole 1.02: 11(-0.92,-12.95) 12(1.62,-12.95) 13(9.8,-12.95) 14(12.34,-12.95)
  round 2.4 hole 1.6: 15(-2.035,-5.84) 16(13.455,-5.84)
  round 1.625 hole 3.25 unplated: 17(-0.005,-8.89) 18(11.425,-8.89)
  silkscreen extent -4.23,-19.79 15.65,2.4, body extent -4.1,-19.81 15.79,1.78, height 15.59
"HM 3X1" [mm] "Header Macho 3x1 2.54mm"
  oval 1.2x1.8 hole 0.8: 1(0,0) 2(2.54,0) 3(5.08,0)
  silkscreen extent -1.27,-1.27 6.35,1.27, body extent -1.27,-1.24 6.35,1.25, height 8.54
"HM 4X1" [mm] "Header Macho 4x1 2.54mm"
  oval 1.2x1.8 hole 0.8: 1(0,0) 2(2.54,0) 3(5.08,0) 4(7.62,0)
  silkscreen extent -1.27,-1.27 8.89,1.27, body extent -1.27,-1.24 8.89,1.25, height 8.54
IND_EPCOS_B82472P6_EPC [mil]
  rect 59x87 smd paste+0 mask+0: 1(-126,0) 2(126,0)
  silkscreen extent -152,-152 152,152, body extent -147,-148 147,148, height 177
"JACK DC" [mm] "2.5mm TH"
  round 2.5 hole 2.4: 0(10.541,0.254)
  oval 1.8x4.5 hole 0.8 slot 3.5 at 90 deg: 1(0,0) 2(5.969,0)
  oval 4.5x1.8 hole 0.8 slot 3.5 at 0 deg: 3(2.794,4.826)
  silkscreen extent -0.76,-4.32 14.48,4.95, body extent -0.79,-4.32 14.51,5.04, height 11.5
"LED 0402" [mm] "LED SMD 0402"
  rect 0.5x0.6 smd: 1(-0.519,0) 2(0.519,0)
  silkscreen extent 1.02,-0.13 1.02,0.07, body extent -0.5,-0.25 0.51,0.25, height 0.45
"Push Boton Nano 2 Pin" [mm] "Push Boton SMD 2 pin"
  rect 2.2x1.5 smd: 1(3.83,0) 2(0.107,0)
  silkscreen extent 1.52,-1.02 2.41,1.02, body extent -0.3,-1.52 4.1,1.48, height 1.8
"Resistencia 0402" [mm]
  rect 0.5x0.6 smd: 1(-0.519,0) 2(0.519,0)
  silkscreen extent -0.1,-0.5 0.1,0.5, body extent -0.57,-0.27 0.58,0.28, height 0.41
RTL8111H-CG [mm] "QFN-32 4x4 mm, paso 0.4 mm, pad expuesto 2.7x2.7 mm - land pattern IPC-7351B densidad nominal"
  rect 0.2x0.7 smd: 1(-1.4,-2) 2(-1,-2) 3(-0.6,-2) 4(-0.2,-2) 5(0.2,-2) 6(0.6,-2) 7(1,-2) 8(1.4,-2) 17(1.4,2) 18(1,2) 19(0.6,2) 20(0.2,2) 21(-0.2,2) 22(-0.6,2) 23(-1,2) 24(-1.4,2)
  rect 0.7x0.2 smd: 9(2,-1.4) 10(2,-1) 11(2,-0.6) 12(2,-0.2) 13(2,0.2) 14(2,0.6) 15(2,1) 16(2,1.4) 25(-2,1.4) 26(-2,1) 27(-2,0.6) 28(-2,0.2) 29(-2,-0.2) 30(-2,-0.6) 31(-2,-1) 32(-2,-1.4)
  rect 2.7x2.7 smd: 33(0,0)
  silkscreen extent -2.9,-2.9 2.25,2.25, body extent -2,-2 2,2, height 0.85
SAMESKY_UJ20-C-H-G-SMT-1-P16-TR [mm]
  rect 0.6x1.15 smd: A1_B12(-3.2,7.345) A4_B9(-2.4,7.345) B1_A12(3.2,7.345) B4_A9(2.4,7.345)
  rect 0.3x1.15 smd: A5(-1.25,7.345) A6(-0.25,7.345) A7(0.25,7.345) A8(1.25,7.345) B5(1.75,7.345) B6(0.75,7.345) B7(-0.75,7.345) B8(-1.75,7.345)
  oval 1x2.1 hole 0.6 slot 1.7 at 90 deg: SH1(-4.32,6.78) SH2(4.32,6.78)
  oval 1x1.8 hole 0.6 slot 1.4 at 90 deg: SH3(-4.32,2.6) SH4(4.32,2.6)
  round 0.65 hole 0.65 unplated: ""(-2.89,6.28) ""(2.89,6.28)
  silkscreen extent -4.47,0 4.47,8.6, body extent -4.47,0 4.47,7.6, height 3.31
SOD2512X110N [mm]
  rect 1.1x0.5 smd: 1(-1.15,0) 2(1.15,0)
  silkscreen extent -1.7,-0.63 0.85,0.63, body extent -1.22,-0.59 1.27,0.66, height 0.88
SOD2512X115N [mm]
  rect 1.1x0.5 smd: 1(-1.15,0) 2(1.15,0)
  silkscreen extent -1.7,-0.63 0.85,0.63, body extent -1.22,-0.63 1.28,0.62, height 1.01
SOD-323_MCC [mil]
  rect 46x18 smd paste+0 mask+0: 1(-44.5,0) 2(44.5,0)
  silkscreen extent -66,-32 41,32, body extent -54,-26 54,26, height 45
SOD-523_0P9X1P3_ONS [mil]
  rect 20x14 smd paste+0 mask+0: 1(-31.5,0) 2(31.5,0)
  silkscreen extent -47,-22 30,22, body extent -34,-17 34,17, height 18
SOD-923_ONS [mm]
  rect 0.528x0.304 smd paste+0 mask+0: 1(-0.607,0) 2(0.607,0)
  Keep-Out Layer region: -0.292,-0.279 -0.292,0.279 0.292,0.279 0.292,-0.279
  silkscreen extent -0.77,-0.41 0.24,0.41, body extent -0.5,-0.3 0.5,0.3, height 0.4
SolderJumper-3_P1.3mm_Bridged12 [mm] "Solder jumper SMD de 3 pads, paso 1.3 mm, puente de cobre entre 1 y 2 (cortable)"
  rect 1x1.5 smd paste-0.5 mask+0.05: 1(-1.3,0)
  rrect50% 1x1.5 smd paste-0.5 mask+0.05: 2(0,0) 3(1.3,0)
  silkscreen extent -2.26,0.64 -2.11,0.79
SOT95P280X145-6N [mm]
  rrect25% 1.21x0.59 smd: 1(-1.255,0.95) 2(-1.255,0) 3(-1.255,-0.95) 4(1.255,-0.95) 5(1.255,0) 6(1.255,0.95)
  silkscreen extent -2.65,-1.57 0.81,1.57, body extent -1.4,-1.46 1.4,1.46, height 0.4
SOT96P240X120-3N [mm]
  rect 1.55x0.559 smd: 1(-0.85,0.706) 2(-0.85,-0.706)
  rect 1.524x0.559 smd: 3(0.85,0)
  silkscreen extent -1.63,1.28 -0.08,1.28, body extent -1.38,-1.08 1.02,1.02, height 1.01
SOT23127P600-8N [mm]
  rect 1.4x0.85 smd: 1(-1.25,0.95) 2(-1.25,-0.95) 3(1.25,0)
  silkscreen extent -1.37,-1.55 0.81,1.92, body extent -1.25,-1.52 1.25,1.48, height 0.95
XTAL_ECS-250-9-37B2-CKM-TR [mm]
  rect 0.85x0.75 smd: 1(-0.675,-0.525) 2(0.675,-0.525) 3(0.675,0.525) 4(-0.675,0.525)
  silkscreen extent -0.77,-1.62 -0.58,-1.43, body extent -1,-0.8 1,0.8, height 0.5

## Part data
B1 B2: library part "Push Boton 2 Pin SMD", "Micro Push"
C1 C9: library part "Capacitor 0805", "Capacitor Cerámico SMD 0805"
C2 C3 C8 C10 C11 C16 C17 C18 C19 C20 C21 C22 C23 C24 C25 C26 C27 C28 C29 C30 C31 C32 C33 C34 C35 C36 C37 C38 C39 C40 C41 C42 C43 C44 C45 C46 C47 C48 C49 C50 C51 C52 C53 C54 C55 C56 C57 C58 C59 C60 C61: library part "Capacitor 0402", "Capacitor Ceramico SMD 0402"
C4 C5 C6 C7 C12 C13 C14 C15: library part "Capacitor 0603", "Capacitor Ceramico SMD 0603"
D1 D2 D3 D4 D5 D6: "Diode Schottky 40 V 3A Surface Mount SMC", Package="SMC-2 ON Semiconductor", Check_prices=https://www.snapeda.com/parts/MBRS340T3G/Onsemi/view-part/?ref=eda, MF="ON Semiconductor", MP=MBRS340T3G, SnapEDA_Link=https://www.snapeda.com/parts/MBRS340T3G/Onsemi/view-part/?ref=snap
D7 D8 D9 D10 D13 D14 D15: "ESD Suppressors / TVS Diodes PESD5V0S1BA/SOD323/SOD2", Manufacturer_Name=Nexperia, Mouser Part Number=771-PESD5V0S1BAF, Datasheet Link=https://assets.nexperia.com/documents/data-sheet/PESD5V0S1BA.pdf, Geometry.Height=1.1mm, Manufacturer_Part_Number=PESD5V0S1BAF, Mouser Price/Stock=https://www.mouser.co.uk/ProductDetail/Nexperia/PESD5V0S1BAF?qs=45Avz0nZxhtk8Fj2r0tKWQ%3D%3D
D11: "1 Amp Schottky Barrier Rectifier 20 - 40 Volts SOD-323", Manufacturer_Name=MCC, Mouser Part Number=833-B5819WSHE3-TP, Datasheet Link=https://www.mccsemi.com/pdf/Products/B5817WSHE3-B5819WSHE3(SOD-323).pdf, Geometry.Height=1.15mm, Manufacturer_Part_Number=B5819WSHE3-TP, Mouser Price/Stock=https://www.mouser.co.uk/ProductDetail/Micro-Commercial-Components-MCC/B5819WSHE3-TP?qs=rSMjJ%252B1ewcQA3fzC3crCWg%3D%3D
D12: "Diodos 40 V 1A Montaje en superficie SOD-323", Manufacturer_Name=MCC, Manufacturer_Part_Number=SD103AWS-TP, Copyright="Copyright (C) 2025 Ultra Librarian. All rights reserved."
F1 F2 F3 F4 F5: "Fuse, Resettable, 603L Series, Polymeric, Surface Mount, 6V, 1A", Package=Package, Check_prices=https://www.snapeda.com/parts/0603L100SLYR/Littelfuse/view-part/?ref=eda, MF=Littelfuse, MP=0603L100SLYR, SnapEDA_Link=https://www.snapeda.com/parts/0603L100SLYR/Littelfuse/view-part/?ref=snap
H1 H2 H3 H4 H5 H6 H7: library part "HM 4x1", "Header Macho 4x1 2.54mm"
H8 H9 H10 H11 J2: library part "HM 3x1", "Header Macho 3x1 2.54mm"
J1: "Coin Cell Battery Retainer, Horizontal SMT, for CR1220 Coin Cell Batteries, Tape & Reeled", Package=None, Check_prices=https://www.snapeda.com/parts/S8411-45R/Harwin+Inc./view-part/?ref=eda, MF=Harwin, MP=S8411-45R, SnapEDA_Link=https://www.snapeda.com/parts/S8411-45R/Harwin+Inc./view-part/?ref=snap
J3: "Body Features: Module Key Type Offset Left", Manufacturer_Name="TE Connectivity", Mouser Part Number=571-2309413-1, ="Body Features: Module Key Type Offset Left", Datasheet Link=https://www.te.com/commerce/DocumentDelivery/DDEController?Action=showdoc&DocId=Customer+Drawing%7F2309413%7F3%7Fpdf%7FEnglish%7FENG_CD_2309413_3.pdf%7F2309413-1, Geometry.Height=9.45mm, Manufacturer_Part_Number=2309413-1, Mouser Price/Stock=https://www.mouser.co.uk/ProductDetail/TE-Connectivity/2309413-1?qs=1mbolxNpo8ckNkoYMswDaw%3D%3D
J4: library part "JACK DC 2.1mm", "Power Jack DC"
J5: "USB-C (USB TYPE-C) USB 2.0 Receptacle Connector 24 (16+8 Dummy) Position Surface Mount, Right Angle; Through Hole", Package=None, Check_prices=https://www.snapeda.com/parts/UJ20-C-H-G-SMT-1-P16-TR/Same+Sky/view-part/?ref=eda, MF="Same Sky", MP=UJ20-C-H-G-SMT-1-P16-TR, SnapEDA_Link=https://www.snapeda.com/parts/UJ20-C-H-G-SMT-1-P16-TR/Same+Sky/view-part/?ref=snap
J6: "Connector Header Through Hole 4 position 0.098\" (2.50mm)", Manufacturer_Name="JST (JAPAN SOLDERLESS TERMINALS)", Manufacturer_Part_Number=B04B-XASK-1-A(LF)(SN), Mouser Part Number=306-B04BXASK1ALFSN, Datasheet Link=https://www.jst-india.com/downloads/series/eXA-WB_(21-03-22).pdf, Geometry.Height=8.8mm, Mouser Price/Stock=https://www.mouser.co.uk/ProductDetail/JST-Commercial/B04B-XASK-1-ALFSN?qs=QpmGXVUTftEXYaWwXjA%2FfQ%3D%3D
J7: "Modular Connectors / Ethernet Connectors GIGABIT 1x1 Tab Down RJ45 w/mag Y/G LED 350uH min 0C ~ 70C", Manufacturer_Name="Halo Electronics", Mouser Part Number=493-HFJ111G01EL12RL, Datasheet Link=https://www.haloelectronics.com/pdf/fastjack-gigabit.pdf, Geometry.Height=15.64mm, Manufacturer_Part_Number=HFJ11-1G01E-L12RL, Mouser Price/Stock=https://www.mouser.co.uk/ProductDetail/HALO-Electronics/HFJ11-1G01E-L12RL?qs=8uu3sA0mUdsaxIpTwn1s5A%3D%3D
J8: "Description", Manufacturer_Name="Global Connector Technology", Copyright="Copyright (C) 2026 Ultra Librarian. All rights reserved.", Manufacturer_Part_Number=USB1100-30-A, RefDes=RefDes, Type=Type
J9: "USB A R/A STAK ASSY THRU HOLE", Manufacturer_Name="TE Connectivity", Copyright="Copyright (C) 2026 Ultra Librarian. All rights reserved.", Manufacturer_Part_Number=5787745-2, RefDes=RefDes, Type=Type
J10: "WR-COM HDMI SMT Horizontal, Receptacle, Type A", Contact Resistance=30mOhm, Manufacturer="Wurth Elektronik", Operating Temperature Max=85°C, Operating Temperature Min=-25°C, Rated Current=0.5A, Working Voltage=40VAC, Category="Input/Output Connectors", ComponentLink1Description="Website Link", ComponentLink1URL=https://www.we-online.com/redexpert/article/685119134923?ad, ComponentLink2Description="Datasheet Link", ComponentLink2URL=https://www.we-online.com/redexpert/spec/685119134923?ad, Connector Type="Type A", Gender=Receptacle, Manufacturer Part Number=685119134923, Match Code=WR-HDMI, Mount="Surface Mount", Number of Pins=19, Orientation=Horizontal, Packaging="Tape and Reel"
J11: "M.2 0.5PITCH 4.2H KEY M 30U AU", Manufacturer_Name="TE Connectivity", Copyright="Copyright (C) 2026 Ultra Librarian. All rights reserved.", Manufacturer_Part_Number=1-2199230-6, RefDes=RefDes, Type=Type
J12: "M.2 0.5PITCH 4.2H KEY E 15U'' AU", Manufacturer_Name="TE Connectivity", Copyright="Copyright (C) 2026 Ultra Librarian. All rights reserved.", Manufacturer_Part_Number=2199230-4, RefDes=RefDes, Type=Type
JP1: library part SolderJumper_3, "Solder jumper de 3 pads", Package=SolderJumper-3_P1.3mm, =SolderJumper_3
L1 L3: "No Description Available", Manufacturer_Name="TDK Epcos", Copyright="Copyright (C) 2026 Ultra Librarian. All rights reserved.", Manufacturer_Part_Number=B82472P6222M000
L2 L4: library part "LED 0402", "LED SMD 0402"
Q1 Q5: "Mosfet N SOT23"
Q2 Q3 Q4: "Canal N Montaje en superficie 30 V 100mA 200mW SOT-23", Manufacturer_Name=onsemi, Manufacturer_Part_Number=2N7002, Mouser Part Number=512-2N7002, Datasheet Link=https://www.onsemi.com/pub/Collateral/NDS7002A-D.PDF, Geometry.Height=1.2mm, Mouser Price/Stock=https://www.mouser.co.uk/ProductDetail/onsemi-Fairchild/2N7002?qs=0dwsXDNhqlz66WJJhrTFjQ%3D%3D
R1 R2 R3 R4 R5 R6 R7 R8 R9 R10 R11 R12 R13 R14 R15 R16 R17 R18 R19 R20 R21 R22 R23 R24 R25 R26 R27 R28 R29 R30 R31 R32 R33 R34 R35 R36 R37 R38 R39 R40 R41 R42 R43 R44 R45 R46 R47 R48 R49 R50 R51 R52 R53 R54 R55 R56 R57 R58 R59 R60: library part "Resistencia SMD 0402", "Resistencia SMD 0402"
U1 U3: "Reductor Reguladores de conmutación IC Positivo Ajuste 1V 1 Salida 3A 8-PowerSOIC (0.154\", 3.90mm de ancho)", Manufacturer_Name="Texas Instruments", Manufacturer_Part_Number=LMR33630ADDAR, Copyright="Copyright (C) 2026 Ultra Librarian. All rights reserved.", RefDes=RefDes, Type=TYPE
U2 U15 U16 U17 U18: "Description", Manufacturer_Name=onsemi, RefDes=RefDes, Type=Type
  U2: Copyright="Copyright (C) 2026 Ultra Librarian. All rights reserved.", Manufacturer_Part_Number=MM5Z3V3T1G
  U15 U16 U17 U18: Copyright="Copyright (C) 2025 Ultra Librarian. All rights reserved.", Manufacturer_Part_Number=ESD9B5.0ST5G
U4: "17V Clamp 5A (8/20Âµs) Ipp Tvs Diode Surface Mount SOT-23-6", Package="SOT-23-6 STMicroelectronics", Availability="In Stock", Check_prices=https://www.snapeda.com/parts/USBLC6-2SC6/STMicroelectronics/view-part/?ref=eda, MF=STMicroelectronics, MP=USBLC6-2SC6, Price=None, Purchase-URL=https://pricing.snapeda.com/search/part/USBLC6-2SC6/?ref=eda, SnapEDA_Link=https://www.snapeda.com/parts/USBLC6-2SC6/STMicroelectronics/view-part/?ref=snap
U5: library part CH224K, "USB PD3.0/2.0 + BC1.2 sink controller, 100 W, ESSOP-10", Manufacturer="WCH (Jiangsu Qin Heng)", Package=ESSOP-10-150mil-1mm, =CH224K, Manufacturer Part Number=CH224K
U6 U7 U8 U9 U10: "Arreglo TVS de 4 canales, 5 V, ultra baja capacitancia"
U11: "Realtek RTL8111H-CG - controlador Ethernet 10/100/1000M integrado para PCI Express, QFN-32 4x4 mm paso 0.4 mm, regulador LDO", Manufacturer="Realtek Semiconductor", Package="QFN-32, 4x4 mm, 0.4 mm pitch, EP 2.7 mm (JEDEC MO-220)", Datasheet="Realtek RTL8111H/RTL8111HS Datasheet rev 1.2", Manufacturer Part Number=RTL8111H-CG
U12 U13 U14 U19 U20: "9.4V (típico) Abrazadera 4 A (8/20µs) Ipp TVS - Diodos Montaje en superficie U-DFN2510-10"
Y1: "Crystal 25MHz Â±10ppm (Tol) Â±10ppm (Stability) 9pF FUND 50Ohm 4-Pin Mini-CSMD T/R", Package="ECX-1637B-37B-4 ECS", Check_prices=https://www.snapeda.com/parts/ECS-250-9-37B2-CKM-TR/ECS/view-part/?ref=eda, MF="ECS Inc.", MP=ECS-250-9-37B2-CKM-TR, SnapEDA_Link=https://www.snapeda.com/parts/ECS-250-9-37B2-CKM-TR/ECS/view-part/?ref=snap

## Free pads (board coordinates)
  round 6.4 hole 3.2: 2(4,4) 2(4,96) 2(166,4) 2(166,96)

## Nets (pads, with @x,y where several pads share a name; then routed paths per layer and width w, separated by ;. In a path a pad name is that pad's centre, name@x,y a point inside that pad or via, vN(x,y) a via of type N, cw(c..) or ccw(c..) an arc to the next point about the centre after c; other vN are vias at no path point)
5V_HDMI_VCC: D12.1 R47.1 R48.1
+1V: C24.2 C25.2 C26.2 C27.2 C28.2 C29.2 U11.3 U11.8 U11.22 U11.24 U11.30
+3V3: C12.2 C13.2 C14.2 C15.2 C20.2 C21.2 C22.2 C23.2 C53.2 C54.2 C55.2 C56.2 H4.1 H4.2 H4.3 H4.4 H7.1 H7.2 H7.3 H7.4 H11.1 H11.2 H11.3 J7.9 J11.2 J12.2 L3.1 Q5.1 R2.1 R3.1 R4.2 R5.2 R6.2 R7.2 R8.2 R9.2 R10.2 R11.2 R19.2 R22.2 R32.2 R33.2 R34.1 R35.1 R49.1 R50.1 R51.1 R54.2 R55.1 R56.1 R57.2 R58.2 U11.11 U11.23 U11.32
+5V: C4.2 C5.2 C6.2 C7.2 C19.2 C36.2 C37.2 C38.2 C39.2 C52.2 D11.1 D12.2 F1.2 F2.2 F3.2 F4.2 F5.2 J6.4 L1.1 R15.2 R29.2
+BATT: J3.115 R1.1
+VCC: C1.2 C2.2 C9.2 C10.2 D1.C D2.C D3.C D4.C D5.C D6.C J3.250 R14.1 U1.2 U3.2
CC1: D7.2 J5.A5 U5.7
CC2: D8.2 J5.B5 U5.6
CKXTAL1: C35.2 R37.2 U11.28 Y1.3
CKXTAL2: C34.2 R37.1 U11.29 Y1.1
EN: R17.1 R18.1 U1.3 U3.3
GND: B1.2 B2.2 C1.1 C2.1 C4.1 C5.1 C6.1 C7.1 C8.1 C9.1 C10.1 C12.1 C13.1 C14.1 C15.1 C16.1 C17.1 C18.1 C19.1 C20.1 C21.1 C22.1 C23.1 C24.1 C25.1 C26.1 C27.1 C28.1 C29.1 C34.1 C35.1 C36.1 C37.1 C38.1 C39.1 C52.1 C53.1 C54.1 C55.1 C56.1 C61.1 D7.1 D8.1 D9.1 D10.1 D13.1 D14.1 D15.1 H3.1 H3.2 H3.3 H3.4 H6.1 H6.2 H6.3 H6.4 H10.1 H10.2 H10.3 J1.N J2.1 J3.11 J3.MP1 J3.MP2 J4.2 J4.3 J5.A1_B12 J5.B1_A12 J5.SH1 J5.SH2 J5.SH3 J5.SH4 J6.1 J7.10 J7.15 J7.16 J8.4 J8.7 J8.13 J8.16 J8.19 J8.20 J8.21 J8.22 J9.4 J9.8 J9.9 J9.10 J9.11 J9.12 J10.2 J10.5 J10.8 J10.11 J10.17 J10.Shell J11.1 J11.76 J11.77 J12.1 J12.76 J12.77 pad.2 Q1.2 Q2.2 R12.1 R13.1 R16.1 R18.2 R21.1 R23.1 R25.2 R36.2 R53.2 R59.1 U1.1 U1.9 U2.1 U3.1 U3.9 U5.0 U6.3 U7.3 U8.3 U9.3 U10.3 U11.33 U12.3 U13.3 U14.3 U15.1 U16.1 U17.1 U18.1 U19.3 U20.3 Y1.2 Y1.4
GPP_D0: H5.4 J3.128 U8.1
GPP_D1: H5.3 J3.130 U8.2
GPP_D2: H5.2 J3.132 U8.4
GPP_D3: H5.1 J3.134 U8.5
HDMI_HPD: D15.2 J10.19 R52.2
HDMI_SCL: D14.2 J10.15 Q3.2 R48.2
HDMI_SDA: D13.2 J10.16 Q4.2 R47.2
I2C2_SCL: H2.4 J3.154 R5.1 U7.1
I2C2_SDA: H1.4 J3.156 R4.1 U6.1
I2C3_SCL: H2.3 J3.150 R7.1 U7.2
I2C3_SDA: H1.3 J3.152 R6.1 U6.2
I2C4_SCL: H2.2 J3.146 R9.1 U7.4
I2C4_SDA: H1.2 J3.148 R8.1 U6.4
I2C5_SCL: H2.1 J3.142 R11.1 U7.5
I2C5_SDA: H1.1 J3.144 R10.1 U6.5
LED1: J7.12 U11.26
LED2: J7.14 U11.25
NetB1_1: B1.1 C17.2 D9.2 R27.1
NetB2_1: B2.1 C18.2 D10.2 R28.1
NetC3_1: C3.1 U1.7
NetC3_2: C3.2 L1.2 U1.8
NetC8_2: C8.2 U1.6
NetC11_1: C11.1 U3.7
NetC11_2: C11.2 L3.2 U3.8
NetC16_2: C16.2 R24.2 U5.1
NetC30_1: C30.1 U11.14
NetC30_2: C30.2 J3.63
NetC31_1: C31.1 U11.13
NetC31_2: C31.2 J3.61
NetC32_1: C32.1 U11.18
NetC32_2: C32.2 J3.66
NetC33_1: C33.1 U11.17
NetC33_2: C33.2 J3.64
NetC57_1: C57.1 J12.35
NetC57_2: C57.2 J3.31
NetC58_1: C58.1 J12.37
NetC58_2: C58.2 J3.33
NetC59_1: C59.1 J11.49
NetC59_2: C59.2 J3.25
NetC60_1: C60.1 J11.47
NetC60_2: C60.2 J3.27
NetC61_2: C61.2 U3.6
NetD1_A: D1.A D2.A D3.A J4.1
NetD11_2: D11.2 J6.3 R29.1 R30.2
NetF1_1: F1.1 J8.1
NetF2_1: F2.1 J9.1
NetF3_1: F3.1 J8.10
NetF4_1: F4.1 J9.5
NetF5_1: F5.1 J10.18
NetJ1_P: J1.P R1.2
NetJ2_2: J2.2 J3.12
NetJ2_3: J2.3 J3.10
NetJ3_2: J3.2 R31.1
NetJ3_4: J3.4 R30.1
NetJ3_28: J3.28 J11.43
NetJ3_30: J3.30 J11.41
NetJ3_34: J3.34 J12.41
NetJ3_36: J3.36 J12.43
NetJ3_76: J3.76 J12.3
NetJ3_78: J3.78 J12.5
NetJ3_85: J3.85 J11.55
NetJ3_87: J3.87 J11.53
NetJ3_88: J3.88 J12.47
NetJ3_90: J3.90 J12.49
NetJ3_94: J3.94 U11.15
NetJ3_96: J3.96 U11.16
NetJ3_100: J3.100 R3.2
NetJ3_102: J3.102 R2.2
NetJ3_131: J3.131 R60.1
NetJ3_169: J3.169 Q4.3 R49.2
NetJ3_171: J3.171 Q3.3 R50.2
NetJ3_183: J3.183 Q5.3 R51.2
NetJ3_185: J3.185 R13.2
NetJ3_187: J3.187 R12.2
NetJ6_2: J6.2 R31.2
NetJ7_1: J7.1 U11.1
NetJ7_2: J7.2 U11.2
NetJ7_3: J7.3 U11.4
NetJ7_4: J7.4 U11.6
NetJ7_5: J7.5 U11.7
NetJ7_6: J7.6 U11.5
NetJ7_7: J7.7 U11.9
NetJ7_8: J7.8 U11.10
NetJ7_11: J7.11 R34.2
NetJ7_13: J7.13 R35.2
NetJ11_10: J11.10 L4.2
NetJ11_52: J11.52 R56.2
NetJ11_68: J11.68 R59.2
NetJ12_50: J12.50 R60.2
NetJ12_53: J12.53 R55.2
NetJ12_54: J12.54 R58.1
NetJ12_56: J12.56 R57.1
NetL2_1: L2.1 R19.1
NetL2_2: L2.2 Q1.3
NetL4_1: L4.1 R54.1
NetQ1_1: Q1.1 R20.1 R21.2
NetQ2_1: Q2.1 R46.2
NetQ2_3: Q2.3 R38.1 R39.1 R40.1 R41.1 R42.1 R43.1 R44.1 R45.1
NetQ3_1: Q3.1 Q4.1
NetQ5_2: Q5.2 R52.1 R53.1
NetR15_1: R15.1 R16.2 U1.5
NetR22_1: R22.1 R23.2 U3.5
NetR24_1: R24.1 R26.1 U4.2
NetR25_1: R25.1 U5.9
NetR26_2: R26.2 U5.8
NetR32_1: R32.1 U11.20
NetR33_1: R33.1 U11.21
NetR36_1: R36.1 U11.31
PLTRST: J3.105 J11.50 J12.52 U11.19
PWR_LED/PSON: J3.5 R20.2 R46.1
PWR_SW: J3.1 R27.2
RST_SW: J3.3 R28.2
SLS_S3: J3.7
SOC_UART0_RX: H8.3 J3.137 U9.1
SOC_UART0_TX: H9.3 J3.139 U10.1
SOC_UART1_RX: H8.2 J3.141 U9.2
SOC_UART1_TX: H9.2 J3.143 U10.2
SOC_UART2_RX: H8.1 J3.140 U9.4
SOC_UART2_TX: H9.1 J3.138 U10.4
STDA_SSRX1_N: J3.18 J8.5 U14.1
STDA_SSRX1_P: J3.16 J8.6 U14.2
STDA_SSRX2_N: J3.24 J8.14 U14.4
STDA_SSRX2_P: J3.22 J8.15 U14.5
STDA_SSTX1_N: C41.1 J8.8 U13.4
STDA_SSTX1_P: C42.1 J8.9 U13.5
STDA_SSTX2_N: C40.1 J8.17 U13.1
STDA_SSTX2_P: C43.1 J8.18 U13.2
TMD_CK_N: C51.2 J3.197
TMD_CK_P: C50.2 J3.199
TMD_D0_N: C49.2 J3.203
TMD_D0_P: C48.2 J3.205
TMD_D1_N: C47.2 J3.209
TMD_D1_P: C46.2 J3.211
TMD_D2_N: C45.2 J3.215
TMD_D2_P: C44.2 J3.217
TMDS_CK_N: C51.1 J10.12 R45.2 U20.5
TMDS_CK_P: C50.1 J10.10 R44.2 U20.4
TMDS_D0_N: C49.1 J10.9 R43.2 U20.2
TMDS_D0_P: C48.1 J10.7 R42.2 U20.1
TMDS_D1_N: C47.1 J10.6 R41.2 U19.5
TMDS_D1_P: C46.1 J10.4 R40.2 U19.4
TMDS_D2_N: C45.1 J10.3 R39.2 U19.2
TMDS_D2_P: C44.1 J10.1 R38.2 U19.1
USB2_D1_N: J3.79 J9.2 U12.5
USB2_D1_P: J3.81 J9.3 U12.4
USB2_D2_N: J3.109 J9.6 U12.2
USB2_D2_P: J3.111 J9.7 U12.1
USB3_D1_N: J3.67 J8.2 U15.2
USB3_D1_P: J3.69 J8.3 U16.2
USB3_D2_N: J3.73 J8.11 U17.2
USB3_D2_P: J3.75 J8.12 U18.2
USB3_SSTX_N: C41.2 J3.15
USB3_SSTX_P: C42.2 J3.13
USB4_SSTX_N: C40.2 J3.21
USB4_SSTX_P: C43.2 J3.19
USB_D_N: J5.A7 J5.B7 U4.4
USB_D_P: J5.A6 J5.B6 U4.6
USB_N: U4.3 U5.5
USB_P: U4.1 U5.4
VBUS: D4.A D5.A D6.A J5.A4_B9 J5.B4_A9 U4.5
Vpullup: R14.2 U2.2
WAKE: J3.103 J11.54 J12.55
pads on no net: J1. J3.6 J3.8 J3.9 J3.14 J3.17 J3.20 J3.23 J3.26 J3.29 J3.32 J3.35 J3.37 J3.38 J3.39 J3.40 J3.41 J3.42 J3.43 J3.44 J3.45 J3.46 J3.47 J3.48 J3.49 J3.50 J3.51 J3.52 J3.53 J3.54 J3.55 J3.56 J3.57 J3.58 J3.59 J3.60 J3.62 J3.65 J3.68 J3.70 J3.71 J3.72 J3.74 J3.77 J3.80 J3.82 J3.83 J3.84 J3.86 J3.89 J3.91 J3.92 J3.93 J3.95 J3.97 J3.98 J3.99 J3.101 J3.104 J3.106 J3.107 J3.108 J3.110 J3.112 J3.113 J3.114 J3.116 J3.117 J3.118 J3.119 J3.120 J3.121 J3.122 J3.123 J3.124 J3.125 J3.126 J3.127 J3.129 J3.133 J3.135 J3.136 J3.145 J3.147 J3.149 J3.151 J3.153 J3.155 J3.157 J3.158 J3.159 J3.160 J3.161 J3.162 J3.163 J3.164 J3.165 J3.166 J3.167 J3.168 J3.170 J3.172 J3.173 J3.174 J3.175 J3.176 J3.177 J3.178 J3.179 J3.180 J3.181 J3.182 J3.184 J3.186 J3.188 J3.189 J3.190 J3.191 J3.192 J3.193 J3.194 J3.195 J3.196 J3.198 J3.200 J3.201 J3.202 J3.204 J3.206 J3.207 J3.208 J3.210 J3.212 J3.213 J3.214 J3.216 J3.218 J3.219 J3.220 J3.221 J3.222 J3.223 J3.224 J3.225 J3.226 J3.227 J3.228 J3.229 J3.230 J3.231 J3.232 J3.233 J3.234 J3.235 J3.236 J3.237 J3.238 J3.239 J3.240 J3.241 J3.242 J3.243 J3.244 J3.245 J3.246 J3.247 J3.248 J3.249 J3.251 J3.252 J3.253 J3.254 J3.255 J3.256 J3.257 J3.258 J3.259 J3.260 J3.MH1 J3.MH2 J4.0 J5. J5.A8 J5.B8 J6.5 J7.17 J7.18 J10.13 J10.14 J11.3 J11.4 J11.5 J11.6 J11.7 J11.8 J11.9 J11.11 J11.12 J11.13 J11.14 J11.15 J11.16 J11.17 J11.18 J11.19 J11.20 J11.21 J11.22 J11.23 J11.24 J11.25 J11.26 J11.27 J11.28 J11.29 J11.30 J11.31 J11.32 J11.33 J11.34 J11.35 J11.36 J11.37 J11.38 J11.39 J11.40 J11.42 J11.44 J11.45 J11.46 J11.48 J11.51 J11.56 J11.57 J11.58 J11.67 J11.69 J11.70 J11.71 J11.72 J11.73 J11.74 J11.75 J11.78 J11.79 J12.4 J12.6 J12.7 J12.8 J12.9 J12.10 J12.11 J12.12 J12.13 J12.14 J12.15 J12.16 J12.17 J12.18 J12.19 J12.20 J12.21 J12.22 J12.23 J12.24 J12.25 J12.26 J12.27 J12.28 J12.29 J12.30 J12.31 J12.32 J12.33 J12.34 J12.36 J12.38 J12.39 J12.40 J12.42 J12.44 J12.45 J12.46 J12.48 J12.51 J12.57 J12.58 J12.67 J12.68 J12.69 J12.70 J12.71 J12.72 J12.73 J12.74 J12.75 J12.78 J12.79 JP1.1 JP1.2 JP1.3 R17.2 U1.4 U1.GND U3.4 U3.GND U5.2 U5.3 U5.10 U6.6 U6.7 U6.9 U6.10 U7.6 U7.7 U7.9 U7.10 U8.6 U8.7 U8.9 U8.10 U9.5 U9.6 U9.7 U9.9 U9.10 U10.5 U10.6 U10.7 U10.9 U10.10 U11.12 U11.27 U12.6 U12.7 U12.9 U12.10 U13.6 U13.7 U13.9 U13.10 U14.6 U14.7 U14.9 U14.10 U19.6 U19.7 U19.9 U19.10 U20.6 U20.7 U20.9 U20.10

## Silkscreen, mask and mechanical layers (free items; w line width, h text height)
Top Overlay:
  lines w0.076: 118.4,35.062 118.4,100.062
Mechanical 1:
  lines w0.076: 154.757,100 ccw(c154.757,100.259) 154.94,100.076 ; 0,0 0,100 170,100 170,0 0,0

## Text inside footprints (layer, text, board x,y; h text height)
J5: Mechanical 13 "PCB EDGE" at 172.545,132.861 h0.7 r90
J9: Top Overlay "*" at 60.948,15.429 h0.7; Mechanical 13 "*" at 60.948,15.429 h0.7
J10: Top Designator "PCB Edge" at 135.991,-0.853 h0.7